# Altium PCB NB3000XN.PcbDoc (part 51 of 71)
Units mil, origin at the board's own origin, x right, y up, seen from the top; angles counter-clockwise.
Board outline 9527.56 x 6929.77 mil, 6 copper layers (Top Layer, GND+SHIELD, MidLayer1, MidLayer2, P2 - 3V3+5V0, Bottom Layer), stack 62.375 mil thick; 832 components, 1027 nets, 4655 pads, 4981 vias.
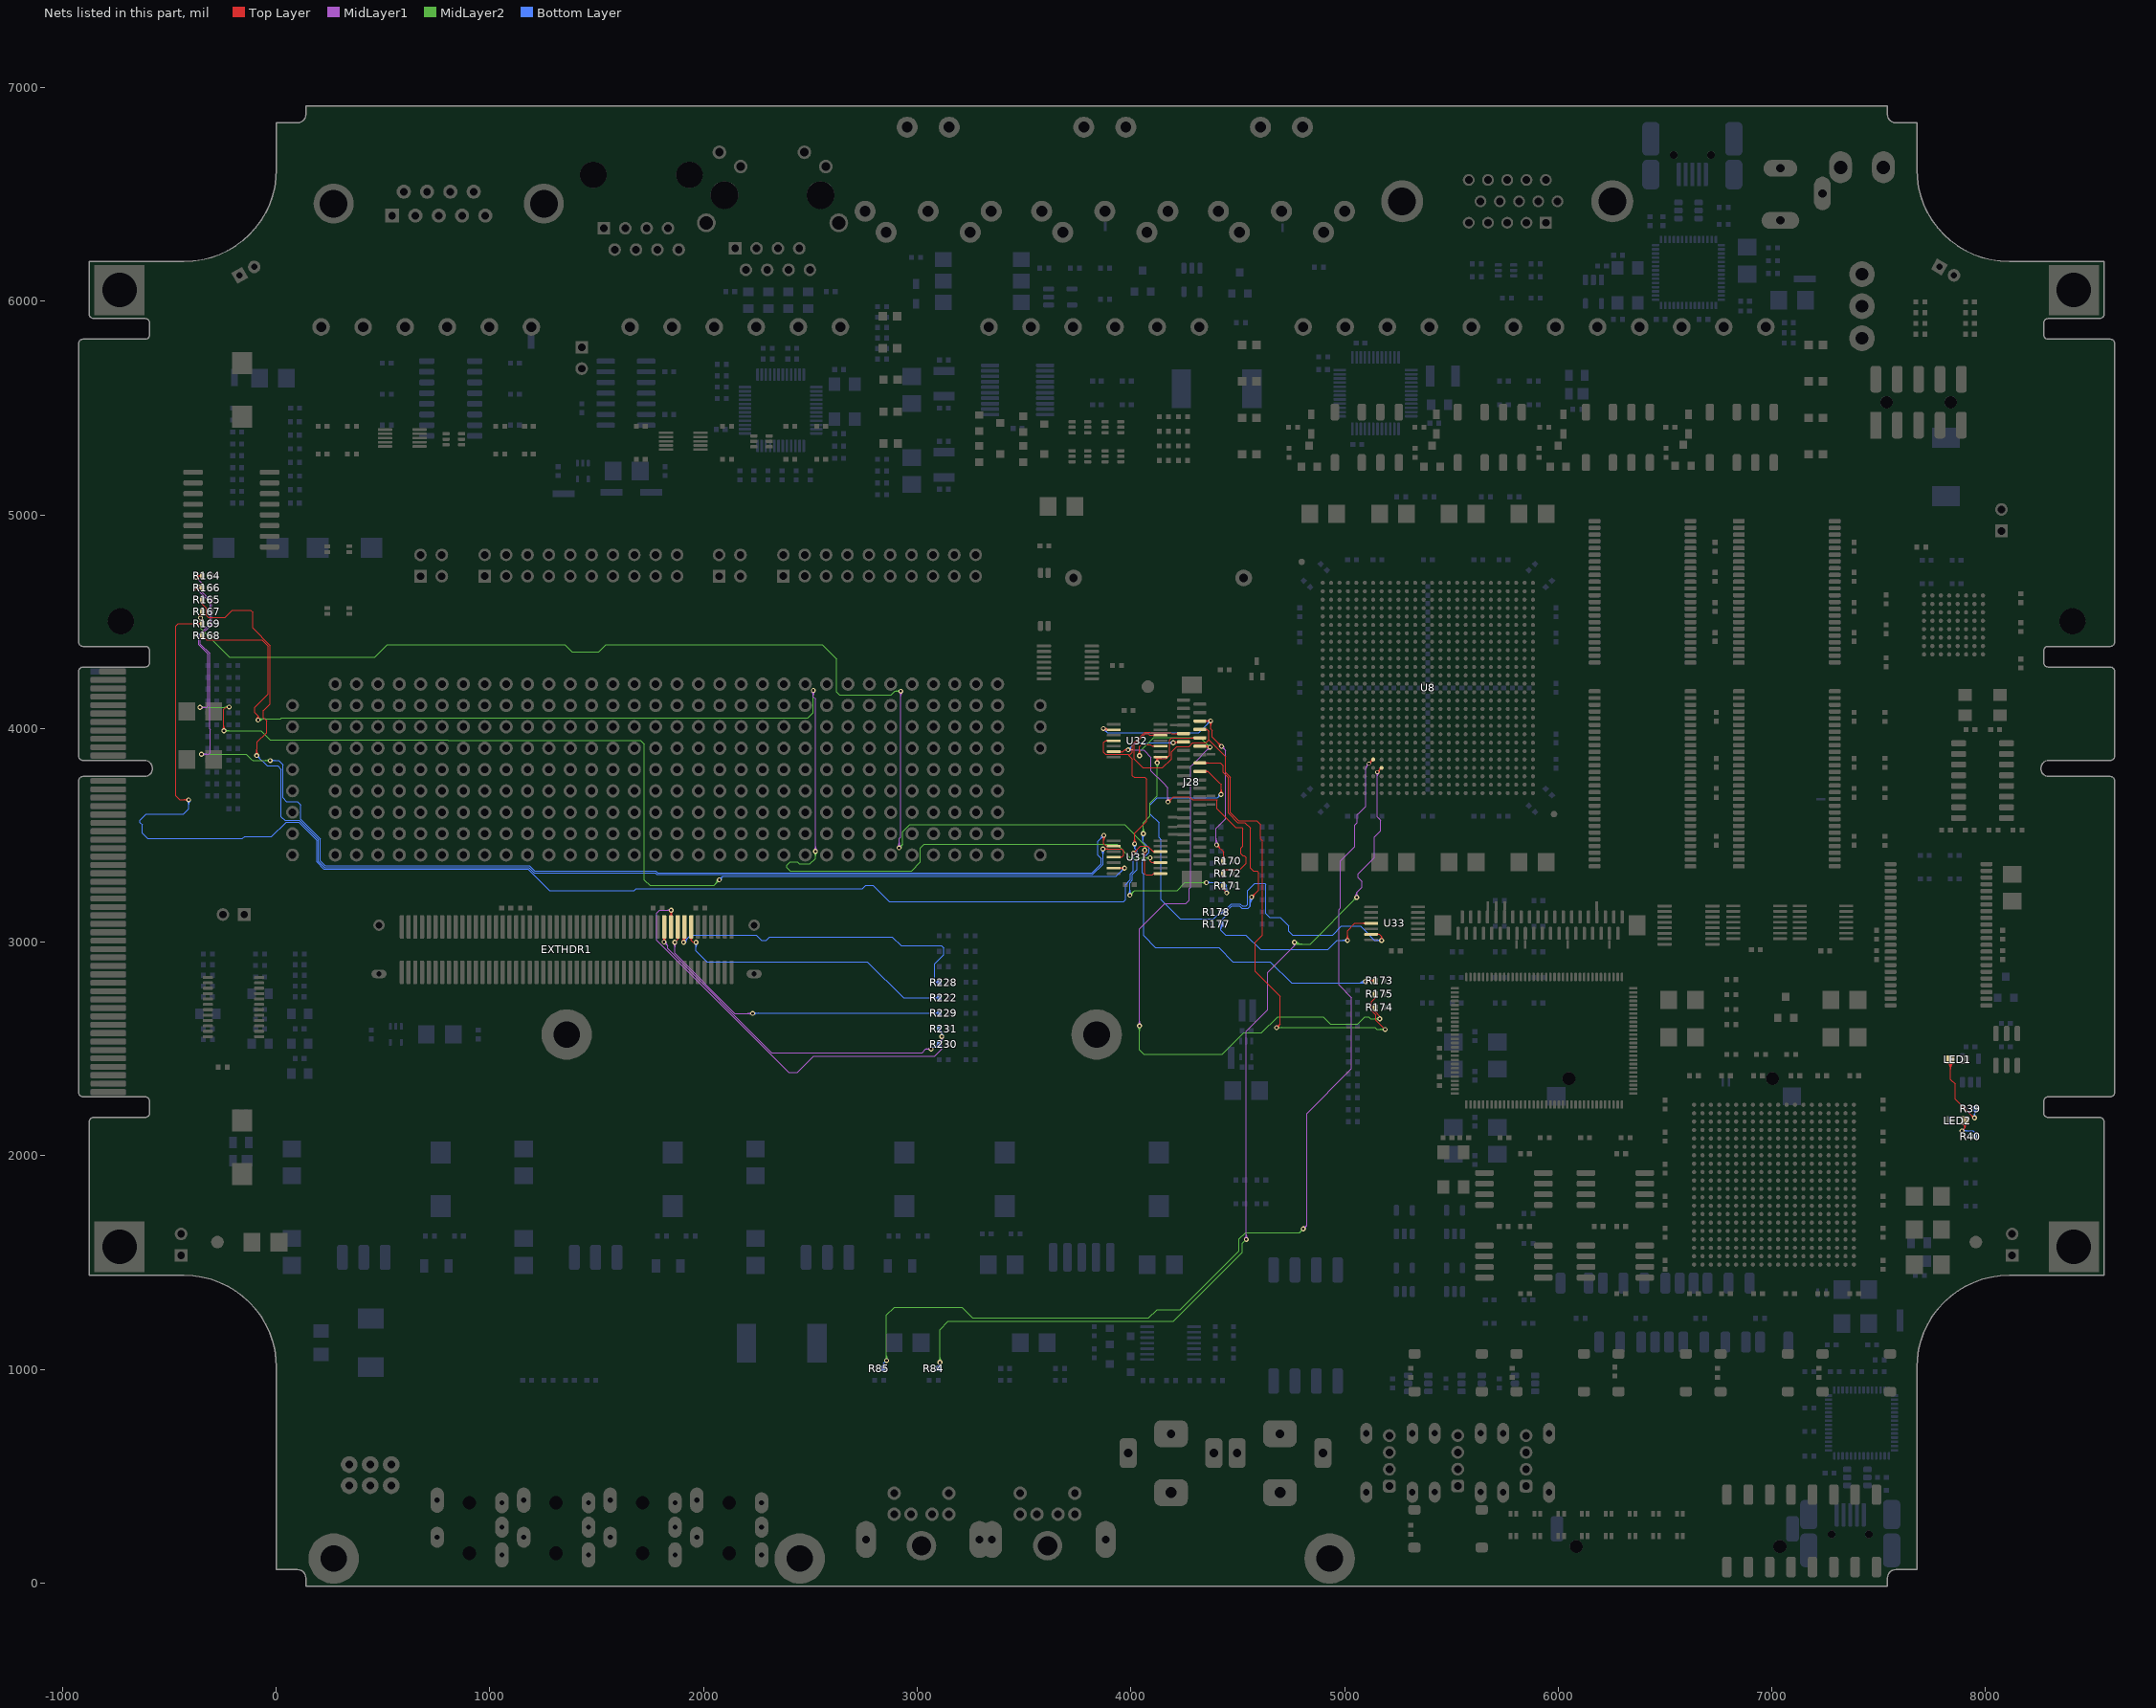
[diagram p55: the nets of this part, all layers, seen from the top]

## Via types
v1: diameter 23, hole 11.81, Top Layer to Bottom Layer, 3672 vias
v2: diameter 26, hole 11.81, Top Layer to Bottom Layer, 461 vias
v3: diameter 19, hole 11.81, Top Layer to Bottom Layer, tented both sides, 396 vias
v4: diameter 23.62, hole 11.81, Top Layer to Bottom Layer, 288 vias
v5: diameter 20, hole 11.81, Top Layer to Bottom Layer, 91 vias
v6: diameter 23, hole 11.81, Top Layer to Bottom Layer, tented both sides, 50 vias
v7: diameter 31, hole 11.81, Top Layer to Bottom Layer, 15 vias
v8: diameter 27.56, hole 11.81, Top Layer to Bottom Layer, tented both sides, 4 vias
v9: diameter 29, hole 11.81, Top Layer to Bottom Layer, 3 vias
v10: diameter 21, hole 11.81, Top Layer to Bottom Layer, 1 vias

## Nets (pads, with @x,y where several pads share a name; then routed paths per layer and width w, separated by ;. In a path a pad name is that pad's centre, name@x,y a point inside that pad or via, vN(x,y) a via of type N, cw(c..) or ccw(c..) an arc to the next point about the centre after c; other vN are vias at no path point) (continued)
JTAG.HARD.TMS: EXTHDR1.13 R222.2 | length 1502
  Top Layer w4: EXTHDR1.13@1936.82,3020.94 cw(c1924.52,3008.04) 1942.35,3008.04 ; EXTHDR1.13@1942.35,3071.85 1942.35,3008.04 ; EXTHDR1.13@1947.87,3020.94 ccw(c1960.18,3008.04) 1942.35,3008.04 ; v1(1965.19,3000.04) 1950.35,3000.04 1942.35,3008.04
  Bottom Layer w4: v1@1958.47,2993.32 cw(c1942.26,2977.11) 1965.19,2977.11 cw(c1988.13,2977.11) v1@1971.91,2993.32 ; v1@1961.3,2996.15 cw(c1951.91,2986.76) 1965.19,2986.76 cw(c1978.47,2986.76) v1@1969.08,2996.15 ; v1(1965.19,3000.04) 1965.19,2958.37 2015.19,2908.37 2767.07,2908.37 2935.44,2740 R222.2@3103.82,2740 ; R222.2@3097.23,2733.41 ccw(c3081.32,2717.5) 3081.32,2740 ccw(c3081.32,2762.5) R222.2@3097.23,2746.59 ; R222.2@3100.06,2736.24 ccw(c3090.98,2727.16) 3090.98,2740 ccw(c3090.98,2752.84) R222.2@3100.06,2743.76
JTAG.SOFT.TCK: EXTHDR1.19 R231.2 | length 2259.8
  Top Layer w4: v1@1841.81,3143.32 cw(c1825.59,3127.11) 1848.52,3127.11 cw(c1871.46,3127.11) v1@1855.24,3143.32 ; EXTHDR1.19@1842.2,3122.62 ccw(c1826.94,3137.89) 1848.52,3137.89 ; v1@1844.64,3146.15 cw(c1835.25,3136.76) 1848.52,3136.76 cw(c1861.8,3136.76) v1@1852.41,3146.15 ; EXTHDR1.19@1845.03,3119.8 ccw(c1836.59,3128.23) 1848.52,3128.23 ; EXTHDR1.19@1847.86,3071.85 1847.86,3091.71 1848.52,3091.71 v1(1848.52,3150.04) ; 1848.52,3134.67 ccw(c1865.56,3134.67) EXTHDR1.19@1853.51,3122.62
  MidLayer1 w4: v1@1840.35,3145.2 ccw(c1831.86,3140.17) 1831.86,3150.04 ccw(c1831.86,3159.91) v1@1840.35,3154.88 ; v1(1848.52,3150.04) 1795.04,3150.04 1781.86,3136.86 1781.86,3008.37 2398.52,2391.71 2440.19,2391.71 2515.19,2466.71 3081.86,2466.71 3115.19,2500.04 v1(3115.19,2558.37) ; v1@3108.47,2551.66 cw(c3092.26,2535.44) 3115.19,2535.44 cw(c3138.13,2535.44) v1@3121.91,2551.66 ; v1@3111.3,2554.49 cw(c3101.91,2545.1) 3115.19,2545.1 cw(c3128.47,2545.1) v1@3119.08,2554.49
  Bottom Layer w4: R231.2@3103.82,2591.71 3103.82,2594.51 R231.2@3103.82,2595 ; R231.2@3103.86,2591.71 3115.19,2580.37 ; R231.2@3104.5,2585.21 cw(c3105.38,2573.33) 3113.81,2581.76 cw(c3119.32,2587.26) R231.2@3112.26,2590.56 ; v1@3108.68,2565.29 ccw(c3094.47,2580.37) 3115.19,2580.37 ; v1@3111.42,2562.38 ccw(c3103.19,2571.11) 3115.19,2571.11 ccw(c3127.19,2571.11) v1@3118.96,2562.38 ; v1(3115.19,2558.37) 3115.19,2580.37 ; v1@3121.7,2565.29 cw(c3135.91,2580.37) 3115.19,2580.37
JTAG.SOFT.TDI: EXTHDR1.15 R228.2 | length 1709.2
  Top Layer w4: v1@1900.14,3006.76 ccw(c1874.28,3032.62) EXTHDR1.15@1910.85,3032.62 ; v1@1902.97,3003.93 ccw(c1883.94,3022.96) EXTHDR1.15@1910.85,3022.96 ; EXTHDR1.15@1905.19,3021.07 cw(c1891.54,3007.42) 1910.85,3007.42 cw(c1930.16,3007.42) EXTHDR1.15@1916.51,3021.07 ; v1@1905.8,3001.1 ccw(c1893.6,3013.3) 1910.85,3013.3 ccw(c1920.15,3013.34) v1@1913.57,3006.76 ; v1(1906.86,3000.04) 1910.85,3004.03 EXTHDR1.15@1910.85,3071.85
  Bottom Layer w4: v1(1906.86,3000.04) 1940.52,3033.71 2246.86,3033.71 2272.19,3008.37 2293.37,3008.37 2310.37,3025.37 2882.39,3025.37 2924.39,2983.37 3113.86,2983.37 3123.52,2973.71 3123.52,2941.71 3081.86,2900.04 3081.86,2820.83 3090.19,2812.5 ; v1@1906.86,3005.54 ccw(c1906.86,3018.82) 1916.25,3009.43 ccw(c1925.64,3000.04) v1@1912.36,3000.04 ; v1@1906.86,3009.54 ccw(c1906.86,3032.48) 1923.07,3016.26 ccw(c1939.29,3000.04) v1@1916.36,3000.04 ; R228.2@3095.13,2809.12 ccw(c3090.19,2807.19) 3090.19,2812.5 ; R228.2@3095.13,2815.88 cw(c3090.19,2817.81) 3090.19,2812.5 ; R228.2@3103.82,2812.5 3090.19,2812.5
JTAG.SOFT.TDO: EXTHDR1.17 R229.2 | length 1716.4
  Top Layer w4: v1(1865.19,3000.04) 1879.35,3014.2 ; EXTHDR1.17@1875.99,3019.47 cw(c1873.55,3014.21) 1879.35,3014.21 ; EXTHDR1.17@1879.35,3071.85 1879.35,3014.2 ; EXTHDR1.17@1882.72,3019.47 ccw(c1885.16,3014.21) 1879.35,3014.21
  MidLayer1 w4: v1@1858.47,2993.32 cw(c1842.26,2977.11) 1865.19,2977.11 cw(c1888.13,2977.11) v1@1871.91,2993.32 ; v1@1861.3,2996.15 cw(c1851.91,2986.76) 1865.19,2986.76 cw(c1878.47,2986.76) v1@1869.08,2996.15 ; v1(1865.19,3000.04) 1865.19,2975 1865.19,2947.67 2146.15,2666.71 v1(2229.86,2666.71) ; v1@2223.14,2659.99 ccw(c2206.92,2643.77) 2206.92,2666.71 ccw(c2206.92,2689.64) v1@2223.14,2673.43 ; v1@2225.97,2662.82 ccw(c2216.58,2653.43) 2216.58,2666.71 ccw(c2216.58,2679.99) v1@2225.97,2670.6
  Bottom Layer w4: v1(2229.86,2666.71) 2230.65,2667.5 R229.2@3103.82,2667.5 ; v1@2233.75,2662.82 cw(c2245.05,2651.52) 2245.05,2667.5 ; v1@2236.57,2659.99 cw(c2254.7,2641.86) 2254.7,2667.5 ; v1@2236.57,2673.43 ccw(c2250.88,2687.73) 2250.88,2667.5 ; R229.2@3097.23,2660.91 ccw(c3081.32,2645) 3081.32,2667.5 ccw(c3081.32,2690) R229.2@3097.23,2674.09 ; R229.2@3100.06,2663.74 ccw(c3090.98,2654.66) 3090.98,2667.5 ccw(c3090.98,2680.34) R229.2@3100.06,2671.26
JTAG.SOFT.TMS: EXTHDR1.21 R230.2 | length 1926.8
  Top Layer w4: v1@1808.47,3007.43 ccw(c1789.43,3026.47) EXTHDR1.21@1816.36,3026.47 ; EXTHDR1.21@1810.7,3021.07 cw(c1797.05,3007.42) 1816.36,3007.42 cw(c1835.67,3007.42) EXTHDR1.21@1822.02,3021.07 ; v1@1811.3,3004.6 ccw(c1799.08,3016.82) EXTHDR1.21@1816.36,3016.82 ; v1(1815.19,3000.71) 1816.36,3001.88 EXTHDR1.21@1816.36,3071.85 ; EXTHDR1.21@1816.36,3020.81 ccw(c1835.3,3020.81) v1@1821.91,3007.43
  MidLayer1 w4: v1(1815.19,3000.71) 1831.33,2984.57 ; v1@1815.22,2991.21 cw(c1815.31,2968.56) 1831.32,2984.57 ; v1@1815.21,2995.21 cw(c1815.26,2982.09) 1824.53,2991.37 cw(c1833.8,3000.64) v1@1820.69,3000.69 ; v1@1824.69,3000.67 ccw(c1847.34,3000.59) 1831.32,2984.57 ; v1@3058.47,2493.32 ccw(c3042.26,2477.11) 3042.26,2500.04 ccw(c3042.26,2522.98) v1@3058.47,2506.76 ; v1@3061.3,2496.15 ccw(c3051.91,2486.76) 3051.91,2500.04 ccw(c3051.91,2513.32) v1@3061.3,2503.93 ; v1(3065.19,2500.04) 3040,2500.04 3023,2483.04 2318.51,2483.04 1831.33,2970.22 1831.33,2984.57
  Bottom Layer w4: v1(3065.19,2500.04) 3075.19,2510.04 ; 3080.57,2510.04 ccw(c3080.57,2529) R230.2@3098.73,2523.54 ; 3085.95,2510.04 ccw(c3085.95,2527.38) R230.2@3102.56,2522.39 ; 3091.33,2510.04 ccw(c3091.33,2525.76) R230.2@3106.39,2521.24 ; R230.2@3094.89,2524.69 cw(c3075.19,2530.62) 3075.19,2510.04 ; 3096.71,2510.04 ccw(c3096.71,2524.15) R230.2@3110.22,2520.08 ; 3102.09,2510.04 ccw(c3102.09,2522.53) R230.2@3114.05,2518.93 ; R230.2@3103.82,2522.5 3103.82,2510.04 3075.19,2510.04
KEYBOARD.CLOCK: R85.1 U8.AB7 | length 5179.3
  Top Layer w4: v3(5114.41,3835.67) U8.AB7@5134.09,3855.35 ; U8.AB7@5126.59,3855.35 cw(c5108.49,3855.35) 5121.29,3842.55 cw(c5134.09,3829.75) U8.AB7@5134.09,3847.85 ; U8.AB7@5126.75,3855.35 cw(c5109.03,3855.35) 5121.56,3842.82 cw(c5134.09,3830.29) U8.AB7@5134.09,3848.01 ; 5127.21,3848.47 cw(c5114.41,3861.28) 5114.41,3843.17 ccw(c5114.41,3861.28) 5127.21,3848.47 ; 5127.21,3848.47 ccw(c5140.02,3835.67) 5121.91,3835.67 cw(c5140.02,3835.67) 5127.21,3848.47
  MidLayer1 w4: v1(4806.86,1658.37) 4823.52,1675.04 4823.52,2198.71 5021.14,2396.33 ; v1@4806.86,1663.87 ccw(c4806.86,1677.15) 4816.25,1667.76 ccw(c4825.64,1658.37) v1@4812.36,1658.37 ; v1@4806.86,1667.87 ccw(c4806.86,1690.81) 4823.08,1674.59 ccw(c4839.29,1658.37) v1@4816.36,1658.37 ; 5020,2395 5033.52,2408.52 5033.52,2740.04 4973.52,2800.04 4973.52,3152.33 4981.19,3160 4981.19,3380.06 5048.52,3447.39 5048.52,3548.69 5060,3560.16 5060,3597.2 5070,3607.2 ; 5070.03,3607.17 5098.9,3636.04 5098.9,3660 5098.9,3670 5098.9,3718.62 5098.9,3812.16 cw(c5112.95,3812.16) 5103.02,3822.09 ; v3@5106.94,3835.02 cw(c5088.9,3833.44) 5102.77,3821.8 cw(c5116.64,3810.16) v3@5115.06,3828.2
  MidLayer2 w4: v1@2850.14,1048.43 ccw(c2833.92,1064.64) 2856.86,1064.64 ccw(c2879.79,1064.64) v1@2863.57,1048.43 ; v1@2852.97,1045.6 ccw(c2843.58,1054.99) 2856.86,1054.99 ccw(c2870.14,1054.99) v1@2860.75,1045.6 ; v1(2856.86,1041.71) 2856.86,1255 2892.73,1290.87 3210,1290.87 3259.83,1241.04 4083.65,1241.04 4122.33,1279.73 4230.79,1279.73 4506.64,1555.58 4506.64,1610.88 4537.13,1641.37 4789.86,1641.37 v1(4806.86,1658.37) ; v1@4797.36,1658.37 cw(c4774.42,1658.37) 4790.64,1642.16 cw(c4806.86,1625.94) v1@4806.86,1648.87 ; v1@4801.36,1658.37 cw(c4788.08,1658.37) 4797.47,1648.99 cw(c4806.86,1639.6) v1@4806.86,1652.87
  Bottom Layer w4: R85.1@2836.64,1012.08 ccw(c2820.73,1027.99) 2843.23,1027.99 ccw(c2865.73,1027.99) R85.1@2849.82,1012.08 ; R85.1@2839.47,1009.25 ccw(c2830.39,1018.33) 2843.23,1018.33 ccw(c2856.07,1018.33) R85.1@2846.99,1009.25 ; R85.1@2843.23,1005 2843.23,1028.08 v1(2856.86,1041.71)
KEYBOARD.DATA: R84.1 U8.AC8 | length 5037
  Top Layer w4: v3(5153.78,3796.3) U8.AC8@5173.46,3815.98 ; U8.AC8@5165.96,3815.98 cw(c5147.86,3815.98) 5160.66,3803.18 cw(c5173.46,3790.38) U8.AC8@5173.46,3808.48 ; U8.AC8@5166.12,3815.98 cw(c5148.4,3815.98) 5160.93,3803.45 cw(c5173.46,3790.92) U8.AC8@5173.46,3808.64 ; 5166.58,3809.1 ccw(c5179.39,3796.3) 5161.28,3796.3 cw(c5179.39,3796.3) 5166.58,3809.1 ; 5166.58,3809.1 cw(c5153.78,3821.91) 5153.78,3803.8 ccw(c5153.78,3821.91) 5166.58,3809.1
  MidLayer1 w4: v1@4533.47,1615.09 ccw(c4517.26,1631.31) 4540.19,1631.31 ccw(c4563.13,1631.31) v1@4546.91,1615.09 ; v1@4536.3,1612.26 ccw(c4526.91,1621.65) 4540.19,1621.65 ccw(c4553.47,1621.65) v1@4544.08,1612.26 ; v1(4540.19,1608.37) 4540.19,2583.37 4640.19,2683.37 4640.19,2858.37 4765.19,2983.37 ; v1@4760.35,2991.87 cw(c4755.32,2983.38) 4765.19,2983.38 ; v1(4765.19,3000.04) 4765.19,2983.37 ; v1@4770.03,2991.87 ccw(c4775.06,2983.38) 4765.19,2983.38 ; v1@5050.31,3216.59 ccw(c5035.79,3231.86) 5056.86,3231.86 ; v1@5053.07,3213.69 ccw(c5044.66,3222.53) 5056.86,3222.53 ccw(c5069.05,3222.53) v1@5060.65,3213.69 ; v1(5056.86,3209.71) 5056.86,3231.86 ; v1@5063.4,3216.59 cw(c5077.92,3231.86) 5056.86,3231.86 ; v3@5148.48,3791 cw(c5135.67,3778.19) 5153.78,3778.19 cw(c5171.89,3778.19) v3@5159.08,3791 ; v3@5148.59,3791.11 cw(c5136.05,3778.57) 5153.78,3778.57 cw(c5171.51,3778.57) v3@5158.97,3791.11 ; v3(5153.78,3796.3) 5153.78,3718.62 5153.78,3670 5153.78,3660 5153.78,3586.45 5168.52,3571.71 5168.52,3520.65 5140.86,3492.98 5140.86,3395.36 5080.5,3335 5079.19,3335 5064.19,3320 5064.19,3301.04 5081.86,3283.37 5081.86,3256.86 5056.86,3231.86
  MidLayer2 w4: v1@3100.14,1040.09 ccw(c3083.92,1056.31) 3106.86,1056.31 ccw(c3129.79,1056.31) v1@3113.57,1040.09 ; v1@3102.97,1037.26 ccw(c3093.58,1046.65) 3106.86,1046.65 ccw(c3120.14,1046.65) v1@3110.75,1037.26 ; v1(3106.86,1033.37) 3106.86,1186.86 3145.04,1225.04 4198.73,1225.04 4522.64,1548.95 4522.64,1590.82 v1(4540.19,1608.37) ; v1@4763.42,2998.27 ccw(c4779.27,3014.12) 4779.27,2991.71 ; v1(4765.19,3000.04) 4765.19,2993.37 4766.86,2991.71 4838.86,2991.71 v1(5056.86,3209.71) ; v1@4766.25,3001.1 ccw(c4788.93,3023.78) 4788.93,2991.71 ; v1@4769.08,3003.93 ccw(c4798.59,3033.44) 4798.59,2991.71 ; v1@4771.91,3006.76 ccw(c4808.24,3043.09) 4808.24,2991.71 ; v1@5047.36,3209.71 cw(c5024.42,3209.71) 5040.64,3193.49 cw(c5056.86,3177.27) v1@5056.86,3200.21 ; v1@5051.36,3209.71 cw(c5038.08,3209.71) 5047.47,3200.32 cw(c5056.86,3190.93) v1@5056.86,3204.21
  Bottom Layer w4: R84.1@3094.88,1013.79 ccw(c3084.85,1033.37) v1(3106.86,1033.37) 3106.86,1000.04 3099.13,1000.04 R84.1@3099.13,1005 ; R84.1@3096.71,1010.23 ccw(c3088.2,1026.83) v1@3106.86,1026.83 ; R84.1@3098.53,1006.67 ccw(c3091.55,1020.29) 3106.86,1020.29 ; v1@3100.14,1026.66 cw(c3083.92,1010.44) 3106.86,1010.44 cw(c3129.79,1010.44) v1@3113.57,1026.66 ; v1@3102.97,1029.49 cw(c3093.58,1020.1) 3106.86,1020.1 cw(c3120.14,1020.1) v1@3110.75,1029.49
LED1_BLUE_EXTA: R165.2 U31.4 | length 5977.9
  Top Layer w4: R165.2@-351.93,4595.17 cw(c-361.16,4583.38) -346.18,4583.38 ; R165.2@-346.18,4603 -346.18,4583.37 ; R165.2@-340.44,4595.17 ccw(c-331.2,4583.38) -346.18,4583.38 ; v1@-97.86,3880.43 ccw(c-114.08,3896.64) -91.14,3896.64 ccw(c-68.21,3896.64) v1@-84.43,3880.43 ; v1@-95.03,3877.6 ccw(c-104.42,3886.99) -91.14,3886.99 ccw(c-77.86,3886.99) v1@-87.25,3877.6 ; v1(-91.14,3873.71) -91.14,3902.54 -89,3904.69 -89,3937.16 -45,3981.16 -45,4036.25 -59.81,4051.06 -59.81,4084.13 ; -59.81,4084.81 -59.81,4084.13 ; v1(3869.19,3436.37) 3956.52,3436.37 3967.19,3425.71 3967.19,3408.23 3957.19,3398.23 U31.4@3920,3398.23 ; v1@3873.08,3432.49 cw(c3882.47,3423.1) 3882.47,3436.37 cw(c3882.47,3449.65) v1@3873.08,3440.26 ; v1@3875.91,3429.66 cw(c3892.13,3413.44) 3892.13,3436.37 cw(c3892.13,3459.31) v1@3875.91,3443.09 ; U31.4@3949.31,3395.4 cw(c3956.14,3388.57) 3956.14,3398.23 cw(c3956.14,3407.89) U31.4@3949.31,3401.06 ; -346.18,4583.37 -326.48,4563.67 -326.48,4530 -316.48,4520 -240,4520 -205,4555 -120,4555 -110,4545 -110,4470 -29,4389 -29,4114.94 -59.81,4084.13
  Bottom Layer w4: v1@-91.14,3864.21 cw(c-91.14,3841.27) -74.93,3857.49 cw(c-58.71,3873.71) v1@-81.64,3873.71 ; v1@-91.14,3868.21 cw(c-91.14,3854.93) -81.75,3864.32 cw(c-72.36,3873.71) v1@-85.64,3873.71 ; v1(-91.14,3873.71) -42.48,3825.04 6.86,3825.04 23.52,3808.37 23.52,3586.48 40,3570 108.88,3570 198.52,3480.35 198.52,3400 198.52,3377.98 226.46,3350.04 1181.86,3350.04 1206.86,3325.04 1773.52,3325.04 1781.86,3316.71 3821.71,3316.71 3869.19,3364.19 v1(3869.19,3436.37) ; v1@3862.47,3429.66 cw(c3846.26,3413.44) 3869.19,3413.44 cw(c3892.13,3413.44) v1@3875.91,3429.66 ; v1@3865.3,3432.49 cw(c3855.91,3423.1) 3869.19,3423.1 cw(c3882.47,3423.1) v1@3873.08,3432.49
LED1_GREEN_EXTA: R166.2 U31.6 | length 6570.3
  Top Layer w4: v1(-365,4665) -365,4661.52 v1@-367.52,4659 ; v1@-359.6,4666.05 ccw(c-351.04,4667.73) R166.2@-351.04,4659 ; R166.2@-355.68,4666.82 ccw(c-346.18,4668.67) R166.2@-346.18,4659 v1@-367.52,4659 ; R166.2@-353.02,4652.67 ccw(c-367.52,4639.24) v1@-367.52,4659 ; R166.2@-353.02,4665.33 cw(c-367.52,4678.76) v1@-367.52,4659 ; R166.2@-350.08,4655.39 ccw(c-358.36,4647.72) -358.36,4659 ccw(c-358.36,4670.28) R166.2@-350.08,4662.61 ; v1@-251.72,3996.43 ccw(c-267.94,4012.64) -245,4012.64 ccw(c-222.07,4012.64) v1@-238.28,3996.43 ; v1@-248.89,3993.6 ccw(c-258.28,4002.99) -245,4002.99 ccw(c-231.72,4002.99) v1@-241.11,3993.6 ; v1(-245,3989.71) -245,4090 -235,4100 v1@-225,4100 ; U31.6@3920,3347.05 v1(3970.19,3347.04) ; U31.6@3947.24,3347.05 cw(c3947.24,3324.09) v1@3963.47,3340.32 ; U31.6@3947.27,3347.05 ccw(c3947.27,3369.96) v1@3963.47,3353.76 ; U31.6@3949.31,3344.22 cw(c3956.14,3337.39) 3956.14,3347.05 cw(c3956.14,3356.71) U31.6@3949.31,3349.88 ; 3956.9,3347.05 cw(c3956.9,3333.75) v1@3966.3,3343.15 ; 3956.93,3347.05 ccw(c3956.93,3360.3) v1@3966.3,3350.93 ; v1@-367.52,4659 -376.48,4650.04 v1@-367.52,4659
  MidLayer1 w4: v1@-370.76,4657.44 cw(c-379.62,4645.82) -365,4645.82 ; v1(-365,4665) -365,4645.81 ; v1@-359.24,4657.44 ccw(c-350.38,4645.82) -365,4645.82 ; v1(-356.73,4099.58) -324.42,4099.58 -319,4105 -319,4349 -362.5,4392.5 -362.5,4437.75 -309.62,4490.63 -309.62,4589.37 -310.16,4589.91 ; v1@-352.84,4095.69 cw(c-343.45,4086.31) -343.45,4099.58 cw(c-343.45,4112.86) v1@-352.84,4103.47 ; v1@-350.01,4092.87 cw(c-333.79,4076.65) -333.79,4099.58 cw(c-333.79,4122.52) v1@-350.01,4106.3 ; -309.62,4590.44 -365,4645.81
  MidLayer2 w4: v1(-356.73,4099.58) -356.31,4100 v1@-220,4100 ; v1@-352.84,4095.69 cw(c-342.44,4085.3) -342.44,4100 ; v1@-352.84,4103.47 ccw(c-344.45,4111.86) -344.45,4100 ; v1@-350.01,4092.87 cw(c-332.79,4075.64) -332.79,4100 ; v1@-350.01,4106.3 ccw(c-334.8,4121.51) -334.8,4100 ; -245.35,4100 ccw(c-245.35,4126.35) v1@-226.72,4107.72 ; v1(-245,3989.71) -71.02,3989.71 -29.19,3947.87 802.36,3947.87 805,3945.23 1704.77,3945.23 1723.52,3926.48 1723.52,3291.71 1748.52,3266.71 2048.52,3266.71 v1(2073.52,3291.71) ; v1@-241.11,3985.82 cw(c-231.72,3976.43) -231.72,3989.71 cw(c-231.72,4002.99) v1@-241.11,3993.6 ; -240.52,4100 cw(c-240.52,4080.48) v1@-226.72,4094.28 ; v1@-238.28,3982.99 cw(c-222.07,3966.77) -222.07,3989.71 cw(c-222.07,4012.64) v1@-238.28,3996.43 ; -235.69,4100 ccw(c-235.69,4116.69) v1@-223.89,4104.89 ; v1@2064.02,3291.71 cw(c2041.09,3291.71) 2057.31,3275.49 cw(c2073.52,3259.27) v1@2073.52,3282.21 ; v1@2068.02,3291.71 cw(c2054.75,3291.71) 2064.14,3282.32 cw(c2073.52,3272.93) v1@2073.52,3286.21
  Bottom Layer w4: v1(2073.52,3291.71) 2090.19,3308.37 3931.52,3308.37 v1(3970.19,3347.04) ; v1@2073.52,3297.21 ccw(c2073.52,3310.49) 2082.91,3301.1 ccw(c2092.3,3291.71) v1@2079.02,3291.71 ; v1@2073.52,3301.21 ccw(c2073.52,3324.14) 2089.74,3307.93 ccw(c2105.96,3291.71) v1@2083.02,3291.71 ; v1@3960.69,3347.04 cw(c3937.76,3347.04) 3953.97,3330.82 cw(c3970.19,3314.61) v1@3970.19,3337.54 ; v1@3964.69,3347.04 cw(c3951.41,3347.04) 3960.8,3337.65 cw(c3970.19,3328.26) v1@3970.19,3341.54
  other v1: -220,4101
LED1_RED_EXTA: R164.2 U31.2 | length 6388.5
  Top Layer w4: v1(-376.48,4708.37) -369.85,4715 R164.2@-346.18,4715 ccw(c-346.18,4687.98) v1@-368.6,4703.07 ; v1@-375.23,4707.54 cw(c-361.21,4698.1) -361.21,4715 ; v1@-371.91,4705.3 cw(c-353.7,4693.04) R164.2@-353.7,4715 ; R164.2@-352.77,4708.41 ccw(c-368.68,4692.5) -368.68,4715 ccw(c-368.68,4737.5) R164.2@-352.77,4721.59 ; R164.2@-349.94,4711.24 ccw(c-359.02,4702.16) -359.02,4715 ccw(c-359.02,4727.84) R164.2@-349.94,4718.76 ; v1@3866.81,3493.32 cw(c3850.59,3477.11) 3873.52,3477.11 cw(c3896.46,3477.11) v1@3880.24,3493.32 ; v1@3869.64,3496.15 cw(c3860.25,3486.76) 3873.52,3486.76 cw(c3886.8,3486.76) v1@3877.41,3496.15 ; v1(3873.52,3500.04) 3873.52,3461.4 3885.52,3449.41 ; U31.2@3890.32,3447.01 ccw(c3885.52,3443.41) 3885.52,3449.41 ; U31.2@3890.32,3451.81 cw(c3885.52,3455.41) 3885.52,3449.41 ; U31.2@3920,3449.41 3885.52,3449.41
  MidLayer1 w4: v1@-376.48,4698.87 cw(c-376.48,4675.94) -360.26,4692.16 cw(c-344.04,4708.37) v1@-366.98,4708.37 ; v1@-376.48,4702.87 cw(c-376.48,4689.6) -367.09,4698.99 cw(c-357.7,4708.37) v1@-370.98,4708.37 ; v1(-376.48,4708.37) -345,4676.9 -345,4637.13 -301.62,4593.75 -301.62,4487.31 -354.5,4434.44 -354.5,4395.81 -311,4352.31 -311,3998.61 -309.23,3996.83 -309.23,3887 -316.23,3880 v1(-350,3880) ; v1@-346.11,3876.11 cw(c-336.72,3866.72) -336.72,3880 cw(c-336.72,3893.28) v1@-346.11,3883.89 ; v1@-343.28,3873.28 cw(c-327.07,3857.06) -327.07,3880 cw(c-327.07,3902.93) v1@-343.28,3886.72
  MidLayer2 w4: v1(-350,3880) -140,3880 -118.24,3858.24 -110.04,3850.04 v1(-28.14,3850.04) ; v1@-346.11,3876.11 cw(c-336.72,3866.72) -336.72,3880 cw(c-336.72,3893.28) v1@-346.11,3883.89 ; v1@-343.28,3873.28 cw(c-327.07,3857.06) -327.07,3880 cw(c-327.07,3902.93) v1@-343.28,3886.72 ; v1@-34.86,3843.32 ccw(c-51.08,3827.11) -51.08,3850.04 ccw(c-51.08,3872.98) v1@-34.86,3856.76 ; v1@-32.03,3846.15 ccw(c-41.42,3836.76) -41.42,3850.04 ccw(c-41.42,3863.32) v1@-32.03,3853.93
  Bottom Layer w4: v1(-28.14,3850.04) 11.52,3850.04 31.86,3829.71 31.86,3675.04 48.52,3658.37 98.52,3658.37 115.19,3641.71 115.19,3575 206.86,3483.33 206.86,3380.96 229.78,3358.04 1185.17,3358.04 1210.17,3333.04 1776.84,3333.04 1784.84,3325.04 3818.73,3325.04 3861.19,3367.5 3861.19,3391.19 3845,3407.38 3845,3471.52 v1(3873.52,3500.04) ; v1@-24.25,3846.15 cw(c-14.86,3836.76) -14.86,3850.04 cw(c-14.86,3863.32) v1@-24.25,3853.93 ; v1@-21.43,3843.32 cw(c-5.21,3827.11) -5.21,3850.04 cw(c-5.21,3872.98) v1@-21.43,3856.76 ; v1@3864.02,3500.04 cw(c3841.09,3500.04) 3857.31,3483.82 cw(c3873.52,3467.61) v1@3873.52,3490.54 ; v1@3868.02,3500.04 cw(c3854.75,3500.04) 3864.14,3490.65 cw(c3873.52,3481.26) v1@3873.52,3494.54
LED2_BLUE_EXTA: R168.2 U31.10 | length 6747.9
  Top Layer w4: R168.2@-346.18,4425.19 cw(c-346.18,4401.5) -329.43,4418.25 ; R168.2@-346.18,4429.19 cw(c-346.18,4415.16) R168.2@-336.26,4425.08 ; R168.2@-346.18,4435 -326.18,4415 -66.31,4415 -37,4385.69 -37,4163 -100,4100 -100,4075 -85,4060 v1(-85,4040) v1@-80,4045 ; R168.2@-340.86,4434.51 ccw(c-329.21,4434.51) R168.2@-337.45,4426.27 ; R168.2@-336.86,4434.51 ccw(c-315.55,4434.51) -330.62,4419.44 ; v1@-91,4047.36 ccw(c-101.3,4060) -85,4060 ccw(c-68.7,4060) v1@-79,4047.36 ; v1@-88.47,4044.26 ccw(c-94.44,4051.58) -85,4051.58 ccw(c-75.56,4051.58) v1@-81.53,4044.26 ; v1(4090.19,3394.71) 4090.19,3379.81 4097.36,3372.64 U31.10@4138.5,3372.64 ; U31.10@4109.2,3369.81 ccw(c4102.37,3362.98) 4102.37,3372.64 ccw(c4102.37,3382.29) U31.10@4109.2,3375.47
  MidLayer1 w4: v1@2507.14,4171.99 cw(c2490.92,4155.77) 2513.86,4155.77 cw(c2536.79,4155.77) v1@2520.57,4171.99 ; v1@2509.97,4174.82 cw(c2500.58,4165.43) 2513.86,4165.43 cw(c2527.14,4165.43) v1@2517.75,4174.82 ; v1(2513.86,4178.71) 2513.86,4149.67 2523.52,4140 v1(2523.52,3425.04) ; v1@2516.81,3431.76 ccw(c2500.59,3447.98) 2523.52,3447.98 ccw(c2546.46,3447.98) v1@2530.24,3431.76 ; v1@2519.64,3428.93 ccw(c2510.25,3438.32) 2523.52,3438.32 ccw(c2536.8,3438.32) v1@2527.41,3428.93
  MidLayer2 w4: v1@-83.94,4038.94 cw(c-69.31,4024.31) -69.31,4045 ; v1@-81.52,4045 19.96,4045 25,4050.04 2488.86,4050.04 2513.86,4075.04 v1(2513.86,4178.71) ; v1@-81.11,4036.11 cw(c-59.65,4014.65) -59.65,4045 ; v1@-78.28,4033.28 cw(c-49.99,4004.99) -49.99,4045 ; v1@-78.28,4046.72 ccw(c-74.14,4050.86) -74.14,4045 ; v1@2507.14,4171.99 cw(c2490.92,4155.77) 2513.86,4155.77 cw(c2536.79,4155.77) v1@2520.57,4171.99 ; v1@2509.97,4174.82 cw(c2500.58,4165.43) 2513.86,4165.43 cw(c2527.14,4165.43) v1@2517.75,4174.82 ; v1@2516.81,3418.32 cw(c2500.59,3402.11) 2523.52,3402.11 cw(c2546.46,3402.11) v1@2530.24,3418.32 ; v1@2519.64,3421.15 cw(c2510.25,3411.76) 2523.52,3411.76 cw(c2536.8,3411.76) v1@2527.41,3421.15 ; v1(2523.52,3425.04) 2523.52,3391.71 2498.52,3366.71 2448.52,3366.71 2440.19,3375.04 2405.86,3375.04 2390.19,3359.37 2390.19,3349.04 2405.86,3333.37 2973.52,3333.37 3015.19,3375.04 3015.19,3441.71 3031.86,3458.37 3934.86,3458.37 3998.52,3394.71 v1(4090.19,3394.71) ; v1@4083.47,3387.99 ccw(c4067.26,3371.77) 4067.26,3394.71 ccw(c4067.26,3417.64) v1@4083.47,3401.43 ; v1@4086.3,3390.82 ccw(c4076.91,3381.43) 4076.91,3394.71 ccw(c4076.91,3407.99) v1@4086.3,3398.6
LED2_GREEN_EXTA: R169.2 U31.12 | length 6883
  Top Layer w4: v1@-416.53,3659.99 ccw(c-432.74,3643.77) -432.74,3666.71 ccw(c-432.74,3689.64) v1@-416.53,3673.43 ; v1@-413.7,3662.82 ccw(c-423.09,3653.43) -423.09,3666.71 ccw(c-423.09,3679.99) v1@-413.7,3670.6 ; v1(-409.81,3666.71) -451.71,3666.71 -469,3684 -469,4481 -459,4491 R169.2@-346.18,4491 ; R169.2@-352.77,4484.41 ccw(c-368.68,4468.5) -368.68,4491 ccw(c-368.68,4513.5) R169.2@-352.77,4497.59 ; R169.2@-349.94,4487.24 ccw(c-359.02,4478.16) -359.02,4491 ccw(c-359.02,4503.84) R169.2@-349.94,4494.76 ; v1(4011.86,3416.71) 4045.19,3450.04 4078.97,3450.04 4105.19,3423.82 ; v1@4011.86,3422.21 ccw(c4011.86,3435.49) 4021.25,3426.1 ccw(c4030.64,3416.71) v1@4017.36,3416.71 ; v1@4011.86,3426.21 ccw(c4011.86,3449.14) 4028.07,3432.93 ccw(c4044.29,3416.71) v1@4021.36,3416.71 ; 4093.53,3435.48 ccw(c4112.02,3453.97) U31.12@4112.02,3427.82 ; 4100.36,3428.65 ccw(c4112.02,3440.32) U31.12@4112.02,3423.82 ; U31.12@4108.54,3421.86 ccw(c4105.19,3419.98) 4105.19,3423.82 ; U31.12@4108.54,3425.78 cw(c4105.19,3427.66) 4105.19,3423.82 ; U31.12@4138.5,3423.82 4105.19,3423.82
  Bottom Layer w4: v1@-416.53,3659.99 cw(c-432.74,3643.77) -409.81,3643.77 cw(c-386.87,3643.77) v1@-403.09,3659.99 ; v1@-413.7,3662.82 cw(c-423.09,3653.43) -409.81,3653.43 cw(c-396.53,3653.43) v1@-405.92,3662.82 ; v1(-409.81,3666.71) -409.81,3625.19 -434.5,3600.5 -609.1,3600.5 -638.26,3571.34 -638.26,3560.5 -627.5,3549.73 -627.5,3509.65 -602.85,3485 -157.43,3485 -148.22,3494.21 -20.79,3494.21 47,3562 105.56,3562 190.19,3477.37 190.19,3375 223.15,3342.04 1178.54,3342.04 1279.58,3241 1674.94,3241 1683.65,3249.71 2743,3249.71 2760,3266.71 2793.29,3266.71 2868.96,3191.04 3966.04,3191.04 3975,3200 3975,3269.46 3998.52,3292.98 3998.52,3320.96 4011.86,3334.29 v1(4011.86,3416.71)
LED2_RED_EXTA: R167.2 U31.8 | length 6413.1
  Top Layer w4: v1@-360.33,4525.5 ccw(c-372.02,4539.06) R167.2@-354.12,4539.06 ; v1@-357.72,4522.48 ccw(c-364.49,4530.32) -354.12,4530.32 ccw(c-343.76,4530.32) v1@-350.53,4522.48 ; v1@-354.12,4517.21 cw(c-329.96,4517.21) R167.2@-341.67,4538.36 ; v1(-354.12,4518.31) R167.2@-354.12,4539.06 ; v1@-354.12,4524 cw(c-333.72,4524) R167.2@-343.6,4541.85 ; -354.12,4530.79 cw(c-337.48,4530.79) R167.2@-345.54,4545.35 ; R167.2@-354.12,4537.58 cw(c-341.24,4537.58) R167.2@-347.48,4548.85 ; v1@-347.92,4525.5 cw(c-336.23,4539.06) R167.2@-354.12,4539.06 ; R167.2@-346.18,4547 R167.2@-354.12,4539.06 ; v1@4058.47,3423.99 cw(c4042.26,3407.77) 4065.19,3407.77 cw(c4088.13,3407.77) v1@4071.91,3423.99 ; v1@4061.3,3426.82 cw(c4051.91,3417.43) 4065.19,3417.43 cw(c4078.47,3417.43) v1@4069.08,3426.82 ; v1(4065.19,3430.71) 4065.19,3321.04 4071.77,3314.46 4100,3314.46 4107,3321.46 U31.8@4138.5,3321.46 ; 4103.86,3318.31 cw(c4111.48,3310.69) U31.8@4112.02,3321.46
  MidLayer1 w4: v1@2908.47,3448.43 ccw(c2892.26,3464.64) 2915.19,3464.64 ccw(c2938.13,3464.64) v1@2921.91,3448.43 ; v1@2911.3,3445.6 ccw(c2901.91,3454.99) 2915.19,3454.99 ccw(c2928.47,3454.99) v1@2919.08,3445.6 ; v1(2915.19,3441.71) 2915.19,3485.19 2923.52,3493.52 v1(2923.52,4175) ; v1@2916.81,4168.28 cw(c2900.59,4152.06) 2923.52,4152.06 cw(c2946.46,4152.06) v1@2930.24,4168.28 ; v1@2919.64,4171.11 cw(c2910.25,4161.72) 2923.52,4161.72 cw(c2936.8,4161.72) v1@2927.41,4171.11
  MidLayer2 w4: v1@-360.84,4511.59 cw(c-377.06,4495.38) -354.12,4495.38 cw(c-331.19,4495.38) v1@-347.41,4511.59 ; v1@-358.01,4514.42 cw(c-367.4,4505.03) -354.12,4505.03 cw(c-340.85,4505.03) v1@-350.24,4514.42 ; v1(-354.12,4518.31) -354.12,4468.69 -218.81,4333.37 462.52,4333.37 520.86,4391.71 1351.51,4391.71 1384.84,4358.37 1510,4358.37 1543.67,4392.04 2556.52,4392.04 2623.52,4325.04 2623.52,4172.06 2637.21,4158.37 2878.86,4158.37 2895.48,4175 v1(2923.52,4175) ; v1(2915.19,3441.71) 2931.86,3458.37 2931.86,3516.71 2965.19,3550.04 3969.96,3550.04 4065.19,3454.81 v1(4065.19,3430.71) ; v1@2915.19,3447.21 ccw(c2915.19,3460.49) 2924.58,3451.1 ccw(c2933.97,3441.71) v1@2920.69,3441.71 ; v1@2915.19,3451.21 ccw(c2915.19,3474.14) 2931.41,3457.93 ccw(c2947.63,3441.71) v1@2924.69,3441.71 ; v1@2916.81,4168.28 ccw(c2900.59,4152.06) 2900.59,4175 ccw(c2900.59,4197.93) v1@2916.81,4181.72 ; v1@2919.64,4171.11 ccw(c2910.25,4161.72) 2910.25,4175 ccw(c2910.25,4188.28) v1@2919.64,4178.89 ; v1@4058.47,3437.43 ccw(c4042.26,3453.64) 4065.19,3453.64 ccw(c4088.13,3453.64) v1@4071.91,3437.43 ; v1@4061.3,3434.6 ccw(c4051.91,3443.99) 4065.19,3443.99 ccw(c4078.47,3443.99) v1@4069.08,3434.6
LED_PGM: LED2.2 R40.2 | length 297.9
  Top Layer w4: v1(7890.19,2116.71) 7903.47,2129.98 ; LED2.2@7892.97,2150.77 cw(c7877.64,2129.98) 7903.47,2129.98 ; LED2.2@7895.34,2153.99 cw(c7883.48,2137.9) 7903.47,2137.9 cw(c7923.45,2137.9) LED2.2@7911.59,2153.99 ; LED2.2@7903.47,2165 7903.47,2129.98 ; LED2.2@7913.96,2150.77 ccw(c7929.29,2129.98) 7903.47,2129.98
  Bottom Layer w4: v1(7890.19,2116.71) 7941.18,2116.71 7951.18,2106.71 ; v1@7894.08,2112.82 cw(c7903.47,2103.43) 7903.47,2116.71 cw(c7903.47,2129.99) v1@7894.08,2120.6 ; v1@7896.91,2109.99 cw(c7913.13,2093.77) 7913.13,2116.71 cw(c7913.13,2139.64) v1@7896.91,2123.43 ; R40.2@7946.49,2098.54 ccw(c7941.73,2106.71) 7951.18,2106.71 ; R40.2@7951.18,2090 7951.18,2106.71 ; R40.2@7955.87,2098.54 cw(c7960.63,2106.71) 7951.18,2106.71
LED_PWR: LED1.1 R39.2 | length 645.1
  Top Layer w4: LED1.1@7824.03,2437.49 cw(c7793.84,2407.31) 7836.54,2407.31 cw(c7879.23,2407.3) LED1.1@7849.04,2437.49 ; LED1.1@7826.86,2440.32 cw(c7803.5,2416.96) 7836.54,2416.96 cw(c7869.57,2416.96) LED1.1@7846.21,2440.32 ; LED1.1@7829.69,2443.15 cw(c7813.15,2426.62) 7836.54,2426.62 cw(c7859.92,2426.62) LED1.1@7843.38,2443.15 ; LED1.1@7836.54,2450 7836.54,2357.37 7857.54,2336.37 7857.54,2266.03 7945.86,2177.71 v1(7948.52,2177.71) ; 7927.75,2195.81 ccw(c7948.52,2216.58) v1@7948.52,2187.21 ; 7934.19,2189.37 cw(c7922.53,2177.71) v1@7939.02,2177.71 ; 7934.58,2188.98 ccw(c7948.52,2202.92) v1@7948.52,2183.21
  Bottom Layer w4: v1@7943.16,2185.55 ccw(c7936.22,2195.71) 7948.52,2195.71 ; R39.2@7944.89,2212.63 cw(c7931.86,2198.37) 7951.18,2198.37 ; R39.2@7947.59,2215.58 cw(c7940.15,2207.44) 7951.18,2207.44 cw(c7962.21,2207.44) R39.2@7954.77,2215.58 ; v1(7948.52,2177.71) 7948.52,2195.71 ; R39.2@7951.18,2220 7951.18,2198.36 ; v1@7953.88,2185.55 cw(c7960.83,2195.71) 7948.52,2195.71 ; R39.2@7957.47,2212.63 ccw(c7970.51,2198.37) 7951.18,2198.37 ; 7948.52,2195.71 7951.18,2198.36
LEDS#.LED0.BLUE: J28.9 R171.2 U32.4 | length 2336.2
  Top Layer w4: U32.4@3890.69,3940.4 ccw(c3883.86,3933.57) 3883.86,3943.23 ccw(c3883.86,3952.89) U32.4@3890.69,3946.06 ; U32.4@3920,3943.23 3881.86,3943.23 3873.52,3934.89 3873.52,3887.71 3881.86,3879.37 3985.86,3879.37 ; v4@4010.41,3467.28 ccw(c3993.67,3484.03) 4017.35,3484.03 ccw(c4041.04,3484.03) v4@4024.29,3467.28 ; v4@4013.24,3464.46 ccw(c4003.32,3474.38) 4017.35,3474.38 ccw(c4031.38,3474.38) v4@4021.46,3464.46 ; v4(4017.35,3460.35) 4017.35,3510.73 4073.52,3566.9 4073.52,3763.18 4065,3771.71 4015.19,3771.71 4006.86,3780.04 4006.86,3858.37 3992.19,3873.04 ; J28.9@4220.33,3972.22 ccw(c4210.31,3962.2) 4210.31,3976.38 ccw(c4210.31,3990.56) J28.9@4220.33,3980.53 ; J28.9@4248.52,3976.38 4189.66,3976.38 4185,3981.04 4092.52,3981.04 4090.19,3983.37 4065.19,3983.37 4006.86,3925.04 4006.86,3887.71 3992.19,3873.04 ; R171.2@4428.19,3257.08 cw(c4419.59,3245.75) 4433.82,3245.75 ; R171.2@4433.82,3265 4433.82,3245.75 ; R171.2@4439.45,3257.08 ccw(c4448.04,3245.75) 4433.82,3245.75 ; v1(4448.52,3231.04) 4433.82,3245.75 ; 3985.86,3879.37 3992.19,3873.04 ; 3985.86,3879.37 3992.19,3873.04
  MidLayer2 w4: v4(3995,3220) 4017.37,3242.37 4217.5,3242.37 4253.84,3278.71 v1(4353.52,3278.71) ; v4@3995,3225.81 ccw(c3995,3239.84) 4004.92,3229.92 ccw(c4014.84,3220) v4@4000.81,3220 ; v4@3995,3229.81 ccw(c3995,3253.5) 4011.75,3236.75 ccw(c4028.5,3220) v4@4004.81,3220 ; v1@4346.81,3271.99 ccw(c4330.59,3255.77) 4330.59,3278.71 ccw(c4330.59,3301.64) v1@4346.81,3285.43 ; v1@4349.64,3274.82 ccw(c4340.25,3265.43) 4340.25,3278.71 ccw(c4340.25,3291.99) v1@4349.64,3282.6
  Bottom Layer w4: v4@3988.06,3226.94 ccw(c3971.31,3243.69) 3995,3243.69 ccw(c4018.69,3243.69) v4@4001.94,3226.94 ; v4@3990.89,3224.11 ccw(c3980.97,3234.03) 3995,3234.03 ccw(c4009.03,3234.03) v4@3999.11,3224.11 ; v4(3995,3220) 3995,3278.14 4006.86,3290 4006.86,3317.98 4029.52,3340.65 4029.52,3427.37 4017.7,3439.2 4017.7,3460 v4(4017.35,3460.35) ; v4@4011.22,3452.69 cw(c4000.42,3439.2) 4017.7,3439.2 cw(c4036.25,3439.2) v4@4023.89,3453.03 ; v4@4013.72,3455.81 cw(c4007.08,3447.53) 4017.7,3447.53 ; 4017.7,3448.14 cw(c4028.26,3448.14) v4@4021.22,3456.01 ; v1(4353.52,3278.71) 4436.52,3278.71 4448.52,3266.71 v1(4448.52,3231.04) ; v1@4357.41,3274.82 cw(c4366.8,3265.43) 4366.8,3278.71 cw(c4366.8,3291.99) v1@4357.41,3282.6 ; v1@4360.24,3271.99 cw(c4376.46,3255.77) 4376.46,3278.71 cw(c4376.46,3301.64) v1@4360.24,3285.43 ; v1@4441.81,3237.76 ccw(c4425.59,3253.98) 4448.52,3253.98 ccw(c4471.46,3253.98) v1@4455.24,3237.76 ; v1@4444.64,3234.93 ccw(c4435.25,3244.32) 4448.52,3244.32 ccw(c4461.8,3244.32) v1@4452.41,3234.93
LEDS#.LED0.GREEN: J28.11 R172.2 U32.6 | length 1888.6
  Top Layer w4: U32.6@3920,3892.05 3962.2,3892.05 3970.52,3900.37 ; U32.6@3949.31,3889.22 cw(c3956.14,3882.39) 3956.14,3892.05 cw(c3956.14,3901.71) U32.6@3949.31,3894.88 ; v1@3979.02,3895.53 ccw(c3970.52,3890.51) 3970.52,3900.37 ; v1@3979.02,3905.21 cw(c3970.52,3910.24) 3970.52,3900.37 ; v1(3987.19,3900.37) 3970.52,3900.37 ; v1(4173.52,3656.37) 4198.52,3681.37 4274.19,3681.37 4288.86,3666.71 4402.29,3666.71 4403.45,3665.55 4403.45,3623.45 4490.19,3536.71 4519.54,3536.71 4525.19,3531.06 4525.19,3450 4515.19,3440 4515.19,3413.37 4523.52,3405.04 4531.86,3405.04 4540.19,3396.71 4540.19,3370.04 4510.52,3340.37 4439.82,3340.37 4433.82,3334.37 ; v1@4173.52,3661.87 ccw(c4173.52,3675.15) 4182.91,3665.76 ccw(c4192.3,3656.37) v1@4179.02,3656.37 ; v1@4173.52,3665.87 ccw(c4173.52,3688.81) 4189.74,3672.59 ccw(c4205.96,3656.37) v1@4183.02,3656.37 ; v1(4198.52,3933.37) 4202.16,3937.01 J28.11@4246.61,3937.01 ; v1@4199.58,3932.31 cw(c4210.92,3920.98) 4210.92,3937.01 ; v1@4202.41,3929.49 cw(c4220.57,3911.33) J28.11@4220.57,3937.01 ; v1@4205.24,3926.66 cw(c4230.23,3901.67) J28.11@4230.23,3937.01 ; v1@4205.24,3940.09 ccw(c4212.69,3947.54) 4212.69,3937.01 ; J28.11@4220.33,3932.85 ccw(c4210.31,3922.83) 4210.31,3937.01 ccw(c4210.31,3951.19) J28.11@4220.33,3941.16 ; R172.2@4431.98,3332.13 ccw(c4431.53,3334.37) 4433.82,3334.37 ; R172.2@4433.82,3322.5 4433.82,3334.37 ; R172.2@4435.66,3332.13 cw(c4436.11,3334.37) 4433.82,3334.37
  MidLayer1 w4: v1(3987.19,3900.37) 4059.63,3900.37 4095,3865 4095,3800.9 4149.02,3746.88 4173.52,3722.37 v1(4173.52,3656.37) ; v1@3991.08,3896.49 cw(c4000.47,3887.1) 4000.47,3900.37 cw(c4000.47,3913.65) v1@3991.08,3904.26 ; v1@3993.91,3893.66 cw(c4010.13,3877.44) 4010.13,3900.37 cw(c4010.13,3923.31) v1@3993.91,3907.09 ; v1@4166.81,3663.09 ccw(c4150.59,3679.31) 4173.52,3679.31 ccw(c4196.46,3679.31) v1@4180.24,3663.09 ; v1@4169.64,3660.26 ccw(c4160.25,3669.65) 4173.52,3669.65 ccw(c4186.8,3669.65) v1@4177.41,3660.26
  Bottom Layer w4: v1(3987.19,3900.37) 4020.19,3933.37 v1(4198.52,3933.37) ; v1@3987.19,3905.87 ccw(c3987.19,3919.15) 3996.58,3909.76 ccw(c4005.97,3900.37) v1@3992.69,3900.37 ; v1@3987.19,3909.87 ccw(c3987.19,3932.81) 4003.41,3916.59 ccw(c4019.63,3900.37) v1@3996.69,3900.37 ; v1@4191.81,3926.66 ccw(c4175.59,3910.44) 4175.59,3933.37 ccw(c4175.59,3956.31) v1@4191.81,3940.09 ; v1@4194.64,3929.49 ccw(c4185.25,3920.1) 4185.25,3933.37 ccw(c4185.25,3946.65) v1@4194.64,3937.26
LEDS#.LED0.RED: J28.6 R170.2 U32.2 | length 1979.1
  Top Layer w4: v1(3871.19,4000.04) 3876.82,3994.41 U32.2@3920,3994.41 ; v1@3872.25,4001.1 ccw(c3888.41,4017.26) U32.2@3888.41,3994.41 ; v1@3875.08,4003.93 ccw(c3898.06,4026.91) U32.2@3898.06,3994.41 ; v1@3877.91,4006.76 ccw(c3907.72,4036.57) U32.2@3907.72,3994.41 ; U32.2@3890.69,3991.58 ccw(c3883.86,3984.75) 3883.86,3994.41 ccw(c3883.86,4004.07) U32.2@3890.69,3997.24 ; J28.6@4323.39,4035.43 4365.8,4035.43 v1@4373.52,4027.71 ; J28.6@4349.12,4035.43 ccw(c4349.12,4060.44) v1@4366.81,4042.76 ; J28.6@4349.67,4031.28 cw(c4359.69,4021.25) 4359.69,4035.43 cw(c4359.69,4049.61) J28.6@4349.67,4039.59 ; J28.6@4352.06,4035.43 cw(c4352.06,4014.57) 4366.81,4029.32 cw(c4350.59,4013.11) 4373.52,4013.11 cw(c4396.46,4013.11) v1@4380.24,4029.32 ; 4358.78,4035.43 ccw(c4358.78,4050.79) v1@4369.64,4039.93 ; 4361.71,4035.43 cw(c4361.71,4024.23) 4369.64,4032.15 cw(c4360.25,4022.76) 4373.52,4022.76 cw(c4386.8,4022.76) v1@4377.41,4032.15 ; v1(4373.52,4036.04) v1@4373.52,4027.71 ; v1@4401.52,3445.87 cw(c4401.52,3422.94) 4417.74,3439.16 cw(c4433.96,3455.37) v1@4411.02,3455.37 ; v1@4401.52,3449.87 cw(c4401.52,3436.6) 4410.91,3445.99 cw(c4420.3,3455.37) v1@4407.02,3455.37 ; v1(4401.52,3455.37) 4433.82,3423.08 R170.2@4433.82,3380 ; v1@4415.02,3916.71 ccw(c4392.09,3916.71) 4408.31,3932.93 ccw(c4424.52,3949.14) v1@4424.52,3926.21 ; v1@4419.02,3916.71 ccw(c4405.75,3916.71) 4415.14,3926.1 ccw(c4424.52,3935.49) v1@4424.52,3922.21 ; v1(4424.52,3916.71) 4381.86,3959.37 4381.86,3990 4373.52,3998.33 v1@4373.52,4027.71 ; R170.2@4427.23,3387.08 ccw(c4411.32,3402.99) 4433.82,3402.99 ccw(c4456.32,3402.99) R170.2@4440.41,3387.08 ; R170.2@4430.06,3384.25 ccw(c4420.98,3393.33) 4433.82,3393.33 ccw(c4446.66,3393.33) R170.2@4437.58,3384.25
  MidLayer1 w4: v1@4394.81,3462.09 ccw(c4385.83,3471.07) 4398.52,3471.07 ; 4398.52,3475.9 ccw(c4422.04,3475.9) v1@4405.41,3459.26 ; 4398.52,3485.55 ccw(c4431.7,3485.55) v1@4408.24,3462.09 ; v1(4401.52,3455.37) 4398.52,3458.37 4398.52,3531.71 4443.86,3577.04 4443.86,3897.37 v1(4424.52,3916.71) ; v1@4424.52,3907.21 cw(c4424.52,3884.27) 4440.74,3900.49 cw(c4456.96,3916.71) v1@4434.02,3916.71 ; v1@4424.52,3911.21 cw(c4424.52,3897.93) 4433.91,3907.32 cw(c4443.3,3916.71) v1@4430.02,3916.71
  Bottom Layer w4: v1@3871.19,3990.54 cw(c3871.19,3967.61) 3887.41,3983.82 cw(c3903.63,4000.04) v1@3880.69,4000.04 ; v1@3871.19,3994.54 cw(c3871.19,3981.26) 3880.58,3990.65 cw(c3889.97,4000.04) v1@3876.69,4000.04 ; v1(3871.19,4000.04) 3891.19,3980.04 4317.52,3980.04 v1(4373.52,4036.04) ; v1@4364.02,4036.04 cw(c4341.09,4036.04) 4357.31,4019.82 cw(c4373.52,4003.61) v1@4373.52,4026.54 ; v1@4368.02,4036.04 cw(c4354.75,4036.04) 4364.14,4026.65 cw(c4373.52,4017.26) v1@4373.52,4030.54
LEDS#.LED1.BLUE: J28.12 R174.2 U32.10 | length 4019.8
  Top Layer w4: v1@4033.47,3880.09 ccw(c4017.26,3896.31) 4040.19,3896.31 ccw(c4063.13,3896.31) v1@4046.91,3880.09 ; v1@4036.3,3877.26 ccw(c4026.91,3886.65) 4040.19,3886.65 ccw(c4053.47,3886.65) v1@4044.08,3877.26 ; v1(4040.19,3873.37) 4040.19,3915.19 4050.47,3925.46 4092.36,3925.46 4100.19,3917.64 U32.10@4138.5,3917.64 ; U32.10@4109.2,3914.81 ccw(c4102.37,3907.98) 4102.37,3917.64 ccw(c4102.37,3927.3) U32.10@4109.2,3920.47 ; J28.12@4323.39,3917.32 4364.14,3917.32 v1@4366.47,3914.99 ; J28.12@4337.25,3917.32 cw(c4337.25,3879.77) v1@4363.81,3906.32 ; J28.12@4346.91,3917.32 cw(c4346.91,3889.42) v1@4366.64,3909.15 ; J28.12@4349.67,3913.17 cw(c4359.69,3903.14) 4359.69,3917.32 cw(c4359.69,3931.5) J28.12@4349.67,3921.48 ; 4356.57,3917.32 cw(c4356.57,3899.08) v1@4369.46,3911.98 ; 4357.93,3917.32 ccw(c4357.93,3925.64) v1@4363.81,3919.76 ; v1@4366.47,3914.76 v1@4368.19,3913.04 ; R174.2@5137.71,2687.47 cw(c5126.09,2674.08) 5143.82,2674.08 ; R174.2@5140.33,2690.49 cw(c5133.7,2682.85) 5143.82,2682.85 cw(c5153.94,2682.85) R174.2@5147.31,2690.49 ; R174.2@5143.82,2695 5143.82,2674.08 ; R174.2@5149.93,2687.47 ccw(c5161.55,2674.08) 5143.82,2674.08 ; v1(5165.19,2641.71) 5165.19,2652.71 5143.82,2674.08
  MidLayer1 w4: v1@4033.47,2615.09 ccw(c4017.26,2631.31) 4040.19,2631.31 ccw(c4063.13,2631.31) v1@4046.91,2615.09 ; v1@4036.3,2612.26 ccw(c4026.91,2621.65) 4040.19,2621.65 ccw(c4053.47,2621.65) v1@4044.08,2612.26 ; v1(4040.19,2608.37) 4040.19,3063.12 4158.1,3181.03 4257.18,3181.03 4273.52,3197.37 4273.52,3250.04 4280.52,3257.04 4280.52,3823.04 4290.19,3832.71 v1(4370.52,3913.04) ; v1@4361.02,3913.04 cw(c4338.09,3913.04) 4354.31,3896.82 cw(c4370.52,3880.61) v1@4370.52,3903.54 ; v1@4365.02,3913.04 cw(c4351.75,3913.04) 4361.14,3903.65 cw(c4370.52,3894.26) v1@4370.52,3907.54
  MidLayer2 w4: v1@4033.47,2601.66 cw(c4017.26,2585.44) 4040.19,2585.44 cw(c4063.13,2585.44) v1@4046.91,2601.66 ; v1@4035.35,3881.55 ccw(c4030.32,3890.04) 4040.19,3890.04 ; v1@4036.3,2604.49 cw(c4026.91,2595.1) 4040.19,2595.1 cw(c4053.47,2595.1) v1@4044.08,2604.49 ; v1(4040.19,2608.37) 4040.19,2494.81 4060.29,2474.71 4428.54,2474.71 4529.4,2575.56 4612.52,2575.56 4687,2650.04 4899.51,2650.04 4933.17,2616.37 5061.37,2616.37 5095,2650 5113.37,2650 5121.67,2641.71 v1(5165.19,2641.71) ; v1(4040.19,3873.37) 4040.19,3890.04 ; v1@4045.03,3881.55 cw(c4050.06,3890.04) 4040.19,3890.04 ; v1@4361.02,3913.04 ccw(c4338.09,3913.04) 4354.31,3929.26 ccw(c4370.52,3945.48) v1@4370.52,3922.54 ; v1@4365.02,3913.04 ccw(c4351.75,3913.04) 4361.14,3922.43 ccw(c4370.52,3931.82) v1@4370.52,3918.54 ; v1(4370.52,3913.04) 4325.19,3958.37 4108.52,3958.37 4040.19,3890.04 ; v1@5158.47,2634.99 ccw(c5142.26,2618.77) 5142.26,2641.71 ccw(c5142.26,2664.64) v1@5158.47,2648.43 ; v1@5161.3,2637.82 ccw(c5151.91,2628.43) 5151.91,2641.71 ccw(c5151.91,2654.99) v1@5161.3,2645.6
LEDS#.LED1.GREEN: J28.8 R175.2 U32.12 | length 3239
  Top Layer w4: U32.12@4109.2,3965.99 ccw(c4102.37,3959.16) 4102.37,3968.82 ccw(c4102.37,3978.48) U32.12@4109.2,3971.65 ; U32.12@4138.5,3968.82 4088.08,3968.82 4081.86,3975.04 4068.17,3975.04 4015.19,3922.06 4015.19,3858.37 4056.86,3816.71 4148.52,3816.71 4190.19,3858.37 4190.19,3891.71 4215.19,3916.71 4273.19,3916.71 4289.86,3933.37 4350.86,3933.37 4365.19,3947.71 ; J28.8@4323.39,3996.06 4355.39,3996.06 ; J28.8@4350.67,3993.26 cw(c4355.39,3990.7) 4355.39,3996.06 ; J28.8@4350.67,3998.87 ccw(c4355.39,4001.42) 4355.39,3996.06 ; v1(4681.86,2600.04) 4698.86,2617.04 4698.86,2746.73 4581.86,2863.73 4581.86,3000.04 4615.19,3033.37 4615.19,3475.04 4606.86,3483.37 4606.86,3550 4588.15,3568.71 4503.45,3568.71 4465.19,3606.96 4465.19,3772.67 4443.86,3794 4443.86,3869.04 4365.19,3947.71 ; v1@4681.86,2605.54 ccw(c4681.86,2618.82) 4691.25,2609.43 ccw(c4700.64,2600.04) v1@4687.36,2600.04 ; v1@4681.86,2609.54 ccw(c4681.86,2632.48) 4698.07,2616.26 ccw(c4714.29,2600.04) v1@4691.36,2600.04 ; R175.2@5138.56,2749.31 cw(c5131.76,2739.36) 5143.82,2739.36 ; R175.2@5143.82,2757.5 5143.82,2739.35 ; R175.2@5149.08,2749.31 ccw(c5155.88,2739.36) 5143.82,2739.36 ; v1(5190.19,2591.71) 5190.19,2591.96 5147.69,2634.46 5147.69,2658.89 5126.5,2680.08 5126.5,2722.04 5142.15,2737.69 5143.82,2739.35 ; 4355.39,3996.06 4365.19,3986.26 4365.19,3947.71
  MidLayer2 w4: v1(4681.86,2600.04) 5141.87,2600.04 5150.21,2591.71 v1(5190.19,2591.71) ; v1@4685.75,2596.15 cw(c4695.14,2586.76) 4695.14,2600.04 cw(c4695.14,2613.32) v1@4685.75,2603.93 ; v1@4688.57,2593.32 cw(c4704.79,2577.11) 4704.79,2600.04 cw(c4704.79,2622.98) v1@4688.57,2606.76 ; v1@5183.47,2584.99 ccw(c5167.26,2568.77) 5167.26,2591.71 ccw(c5167.26,2614.64) v1@5183.47,2598.43 ; v1@5186.3,2587.82 ccw(c5176.91,2578.43) 5176.91,2591.71 ccw(c5176.91,2604.99) v1@5186.3,2595.6
LEDS#.LED1.RED: J28.10 R173.2 U32.8 | length 2967
  Top Layer w4: U32.8@4112.02,3866.46 cw(c4097.91,3845.08) v1@4123.52,3845.08 ; U32.8@4114.23,3869.8 cw(c4102.82,3852.52) 4123.52,3852.52 ; v1@4117.43,3847.33 ccw(c4106.51,3860.37) 4123.52,3860.37 ; v1@4120,3844.26 ccw(c4113.68,3851.81) 4123.52,3851.81 ccw(c4133.37,3851.81) v1@4127.05,3844.26 ; 4123.33,3860.37 ccw(c4123.33,3864.97) U32.8@4127.89,3864.37 ; v1(4123.52,3840.04) 4123.52,3860.37 ; 4127.9,3860.37 ccw(c4127.9,3864.36) U32.8@4131.85,3863.84 ; v1@4129.62,3847.33 cw(c4140.53,3860.37) 4123.52,3860.37 ; 4132.46,3860.37 ccw(c4132.46,3863.76) U32.8@4135.82,3863.32 ; U32.8@4136.92,3862.79 cw(c4135.88,3860.38) 4138.5,3860.38 cw(c4141.13,3860.38) U32.8@4140.09,3862.79 ; 4137.02,3860.37 ccw(c4137.02,3863.16) U32.8@4139.78,3862.8 ; U32.8@4138.5,3866.46 4123.52,3866.46 4123.52,3860.37 ; U32.8@4164.01,3862.58 ccw(c4165.77,3869.58) U32.8@4170.88,3864.48 ; U32.8@4164.98,3866.46 ccw(c4167.77,3877.56) 4175.87,3869.47 ; U32.8@4165.96,3870.34 ccw(c4169.77,3885.54) 4180.86,3874.46 ; J28.10@4297.11,3952.54 ccw(c4287.08,3942.51) 4287.08,3956.69 ccw(c4287.08,3970.87) J28.10@4297.11,3960.85 ; J28.10@4323.39,3956.69 4190.19,3956.69 4180.86,3947.36 4180.86,3874.46 ; v1(5098.19,2816.37) 5103.9,2816.37 5107.52,2820 R173.2@5143.82,2820 ; v1@5099.25,2815.31 cw(c5110.56,2804) 5110.56,2820 ; v1@5102.08,2812.49 cw(c5120.22,2794.35) 5120.22,2820 ; v1@5104.91,2809.66 cw(c5129.88,2784.69) 5129.88,2820 ; v1@5104.91,2823.09 ccw(c5112.37,2830.56) 5112.37,2820 ; R173.2@5137.23,2813.41 ccw(c5121.32,2797.5) 5121.32,2820 ccw(c5121.32,2842.5) R173.2@5137.23,2826.59 ; R173.2@5140.06,2816.24 ccw(c5130.98,2807.16) 5130.98,2820 ccw(c5130.98,2832.84) R173.2@5140.06,2823.76 ; 4123.52,3860.37 4166.77,3860.37 4180.86,3874.46
  MidLayer2 w4: v1@4051.81,3515.09 ccw(c4035.59,3531.31) 4058.52,3531.31 ccw(c4081.46,3531.31) v1@4065.24,3515.09 ; v1@4054.64,3512.26 ccw(c4045.25,3521.65) 4058.52,3521.65 ccw(c4071.8,3521.65) v1@4062.41,3512.26 ; v1(4058.52,3508.37) 4058.52,3560 4089.69,3591.17 4089.69,3652.27 4123.52,3686.1 v1(4123.52,3840.04) ; v1@4116.81,3833.32 cw(c4100.59,3817.11) 4123.52,3817.11 cw(c4146.46,3817.11) v1@4130.24,3833.32 ; v1@4119.64,3836.15 cw(c4110.25,3826.76) 4123.52,3826.76 cw(c4136.8,3826.76) v1@4127.41,3836.15
  Bottom Layer w4: v1@4051.81,3501.66 cw(c4044.1,3493.95) 4055,3493.95 ; 4055,3476.93 cw(c4089.97,3476.93) v1@4065.24,3501.66 ; 4055,3486.59 cw(c4080.31,3486.59) v1@4062.41,3504.49 ; 4055,3496.25 cw(c4070.65,3496.25) v1@4059.58,3507.31 ; v1(4058.52,3508.37) 4055,3504.85 4055,3470 4085,3440 4085,3420 ; 4085.07,3419.93 4053.52,3388.37 4053.52,3324.98 4060.19,3318.31 4060.19,3030.04 4115.19,2975.04 4411.86,2975.04 4477.86,2909.04 4650.96,2909.04 4751.63,2808.37 5090.19,2808.37 v1(5098.19,2816.37) ; 5055.94,2808.37 ccw(c5055.94,2858.62) v1@5091.47,2823.09 ; 5065.6,2808.37 ccw(c5065.6,2848.97) v1@5094.3,2820.26 ; 5075.26,2808.37 ccw(c5075.26,2839.31) v1@5097.13,2817.44 ; 5084.91,2808.37 ccw(c5084.91,2829.65) v1@5099.96,2814.61
LEDS#.LED2.BLUE: J28.16 R177.2 U33.4 | length 2334.2
  Top Layer w4: J28.16@4323.39,3838.58 4418.32,3838.58 4431.86,3825.04 4431.86,3794.69 4456.86,3769.69 4456.86,3603.98 4500.13,3560.71 4533.48,3560.71 4559.19,3535 4559.19,3347.71 4573.52,3333.37 4590.19,3333.37 4598.52,3325.04 4598.52,3244.71 v1(4565.19,3211.37) ; J28.16@4349.67,3834.43 cw(c4359.69,3824.4) 4359.69,3838.58 cw(c4359.69,3852.76) J28.16@4349.67,3842.74 ; v1@4565.19,3216.87 ccw(c4565.19,3230.15) 4574.58,3220.76 ccw(c4583.97,3211.37) v1@4570.69,3211.37 ; v1@4565.19,3220.87 ccw(c4565.19,3243.81) 4581.41,3227.59 ccw(c4597.63,3211.37) v1@4574.69,3211.37 ; v1@5007.47,3015.09 ccw(c4991.26,3031.31) 5014.19,3031.31 ccw(c5037.13,3031.31) v1@5020.91,3015.09 ; v1@5010.3,3012.26 ccw(c5000.91,3021.65) 5014.19,3021.65 ccw(c5027.47,3021.65) v1@5018.08,3012.26 ; v1(5014.19,3008.37) 5014.19,3054.19 5048.23,3088.23 U33.4@5125,3088.23 ; U33.4@5095.69,3085.4 ccw(c5088.86,3078.57) 5088.86,3088.23 ccw(c5088.86,3097.88) U33.4@5095.69,3091.06
  Bottom Layer w4: R177.2@4414.59,3077.92 cw(c4398.68,3062.01) 4421.18,3062.01 cw(c4443.68,3062.01) R177.2@4427.77,3077.92 ; R177.2@4416.81,3093.72 ccw(c4412.95,3100.99) 4421.18,3100.99 ; R177.2@4417.42,3080.75 cw(c4408.34,3071.67) 4421.18,3071.67 cw(c4434.02,3071.67) R177.2@4424.94,3080.75 ; R177.2@4425.55,3093.72 cw(c4429.41,3100.99) 4421.18,3100.99 ; 4556.86,3168.32 cw(c4608.24,3168.32) v1@4571.91,3204.66 ; 4556.86,3177.98 cw(c4598.59,3177.98) v1@4569.08,3207.49 ; 4556.86,3187.64 cw(c4588.93,3187.64) v1@4566.25,3210.31 ; 4556.86,3197.29 cw(c4579.27,3197.29) v1@4563.42,3213.14 ; v1(4565.19,3211.37) 4556.86,3203.04 4556.86,3166.71 4548.52,3158.37 4520.54,3158.37 4507.88,3171.04 4485,3171.04 4472.5,3171.04 4443.5,3142.03 4443.5,3123.31 4421.18,3100.99 ; v1@5007.47,3001.66 ccw(c4991.26,2985.44) 4991.26,3008.37 ccw(c4991.26,3031.31) v1@5007.47,3015.09 ; v1@5010.3,3004.49 ccw(c5000.91,2995.1) 5000.91,3008.37 ccw(c5000.91,3021.65) v1@5010.3,3012.26 ; v1(5014.19,3008.37) 4965.13,3008.37 4921.8,2965.04 4606.86,2965.04 4538.52,3033.37 4443.52,3033.37 4421.18,3055.72 R177.2@4421.18,3085 4421.18,3100.99
LEDS#.LED2.GREEN: J28.18 R178.2 U33.6 | length 2771.4
  Top Layer w4: J28.18@4323.39,3799.21 4361.39,3799.21 4413.18,3747.42 4422.52,3738.07 v1(4422.52,3691.71) ; J28.18@4349.67,3795.06 cw(c4359.69,3785.03) 4359.69,3799.21 cw(c4359.69,3813.39) J28.18@4349.67,3803.37 ; v1@4415.81,3698.43 ccw(c4399.59,3714.64) 4422.52,3714.64 ccw(c4445.46,3714.64) v1@4429.24,3698.43 ; v1@4418.64,3695.6 ccw(c4409.25,3704.99) 4422.52,3704.99 ccw(c4435.8,3704.99) v1@4426.41,3695.6 ; U33.6@5125,3037.05 5162.85,3037.05 5173.52,3026.37 ; U33.6@5154.31,3034.22 cw(c5161.14,3027.39) 5161.14,3037.05 cw(c5161.14,3046.7) U33.6@5154.31,3039.88 ; v1@5168.17,3016.22 ccw(c5161.23,3026.37) 5173.52,3026.37 ; v1(5173.52,3008.37) 5173.52,3026.37 ; v1@5178.88,3016.22 cw(c5185.82,3026.37) 5173.52,3026.37
  Bottom Layer w4: 4404.43,3125.13 cw(c4421.18,3108.38) R178.2@4421.18,3132.06 ; 4405.62,3126.31 ccw(c4390.55,3141.38) R178.2@4411.86,3141.38 ; R178.2@4411.26,3131.96 cw(c4421.18,3122.04) R178.2@4421.18,3136.06 ; R178.2@4412.45,3133.14 ccw(c4404.21,3141.38) R178.2@4415.86,3141.38 ; v1@4413.02,3691.71 cw(c4390.09,3691.71) 4406.31,3675.49 cw(c4422.52,3659.27) v1@4422.52,3682.21 ; v1@4417.02,3691.71 cw(c4403.75,3691.71) 4413.14,3682.32 cw(c4422.52,3672.93) v1@4422.52,3686.21 ; v1(4422.52,3691.71) 4405.86,3675.04 4123.52,3675.04 4090.19,3641.71 4090.19,3600.04 4131.19,3559.04 4131.19,3489.39 4140.52,3480.06 4140.52,3199.71 4231.86,3108.37 4387.68,3108.37 R178.2@4421.18,3141.88 4432.02,3141.88 4469.52,3179.37 4510.86,3179.37 4521.02,3169.21 4539.21,3169.21 4547.19,3177.19 4547.19,3242.27 4579.96,3275.04 4627.86,3275.04 4631.86,3271.04 4631.86,3133.37 4648.52,3116.71 4698.52,3116.71 4740.19,3075.04 4740.19,3050.37 4756.86,3033.71 4945.21,3033.71 4986.54,3075.04 5074.13,3075.04 5140.8,3008.37 v1(5173.52,3008.37) ; v1@5166.81,3001.66 ccw(c5150.59,2985.44) 5150.59,3008.37 ccw(c5150.59,3031.31) v1@5166.81,3015.09 ; v1@5169.64,3004.49 ccw(c5160.25,2995.1) 5160.25,3008.37 ccw(c5160.25,3021.65) v1@5169.64,3012.26